# Altium PCB ELF 2 & ELF 2_Lite V1.3.PcbDoc (part 4 of 8)
Units mm, origin at the board's own origin, x right, y up, seen from the top; angles counter-clockwise.
Board outline 120 x 75 mm, 4 copper layers (01 TOP, 02 GND, 03 Signal, 04 BOT), stack 0.603 mm thick; 470 components, 412 nets, 2075 pads, 1565 vias.
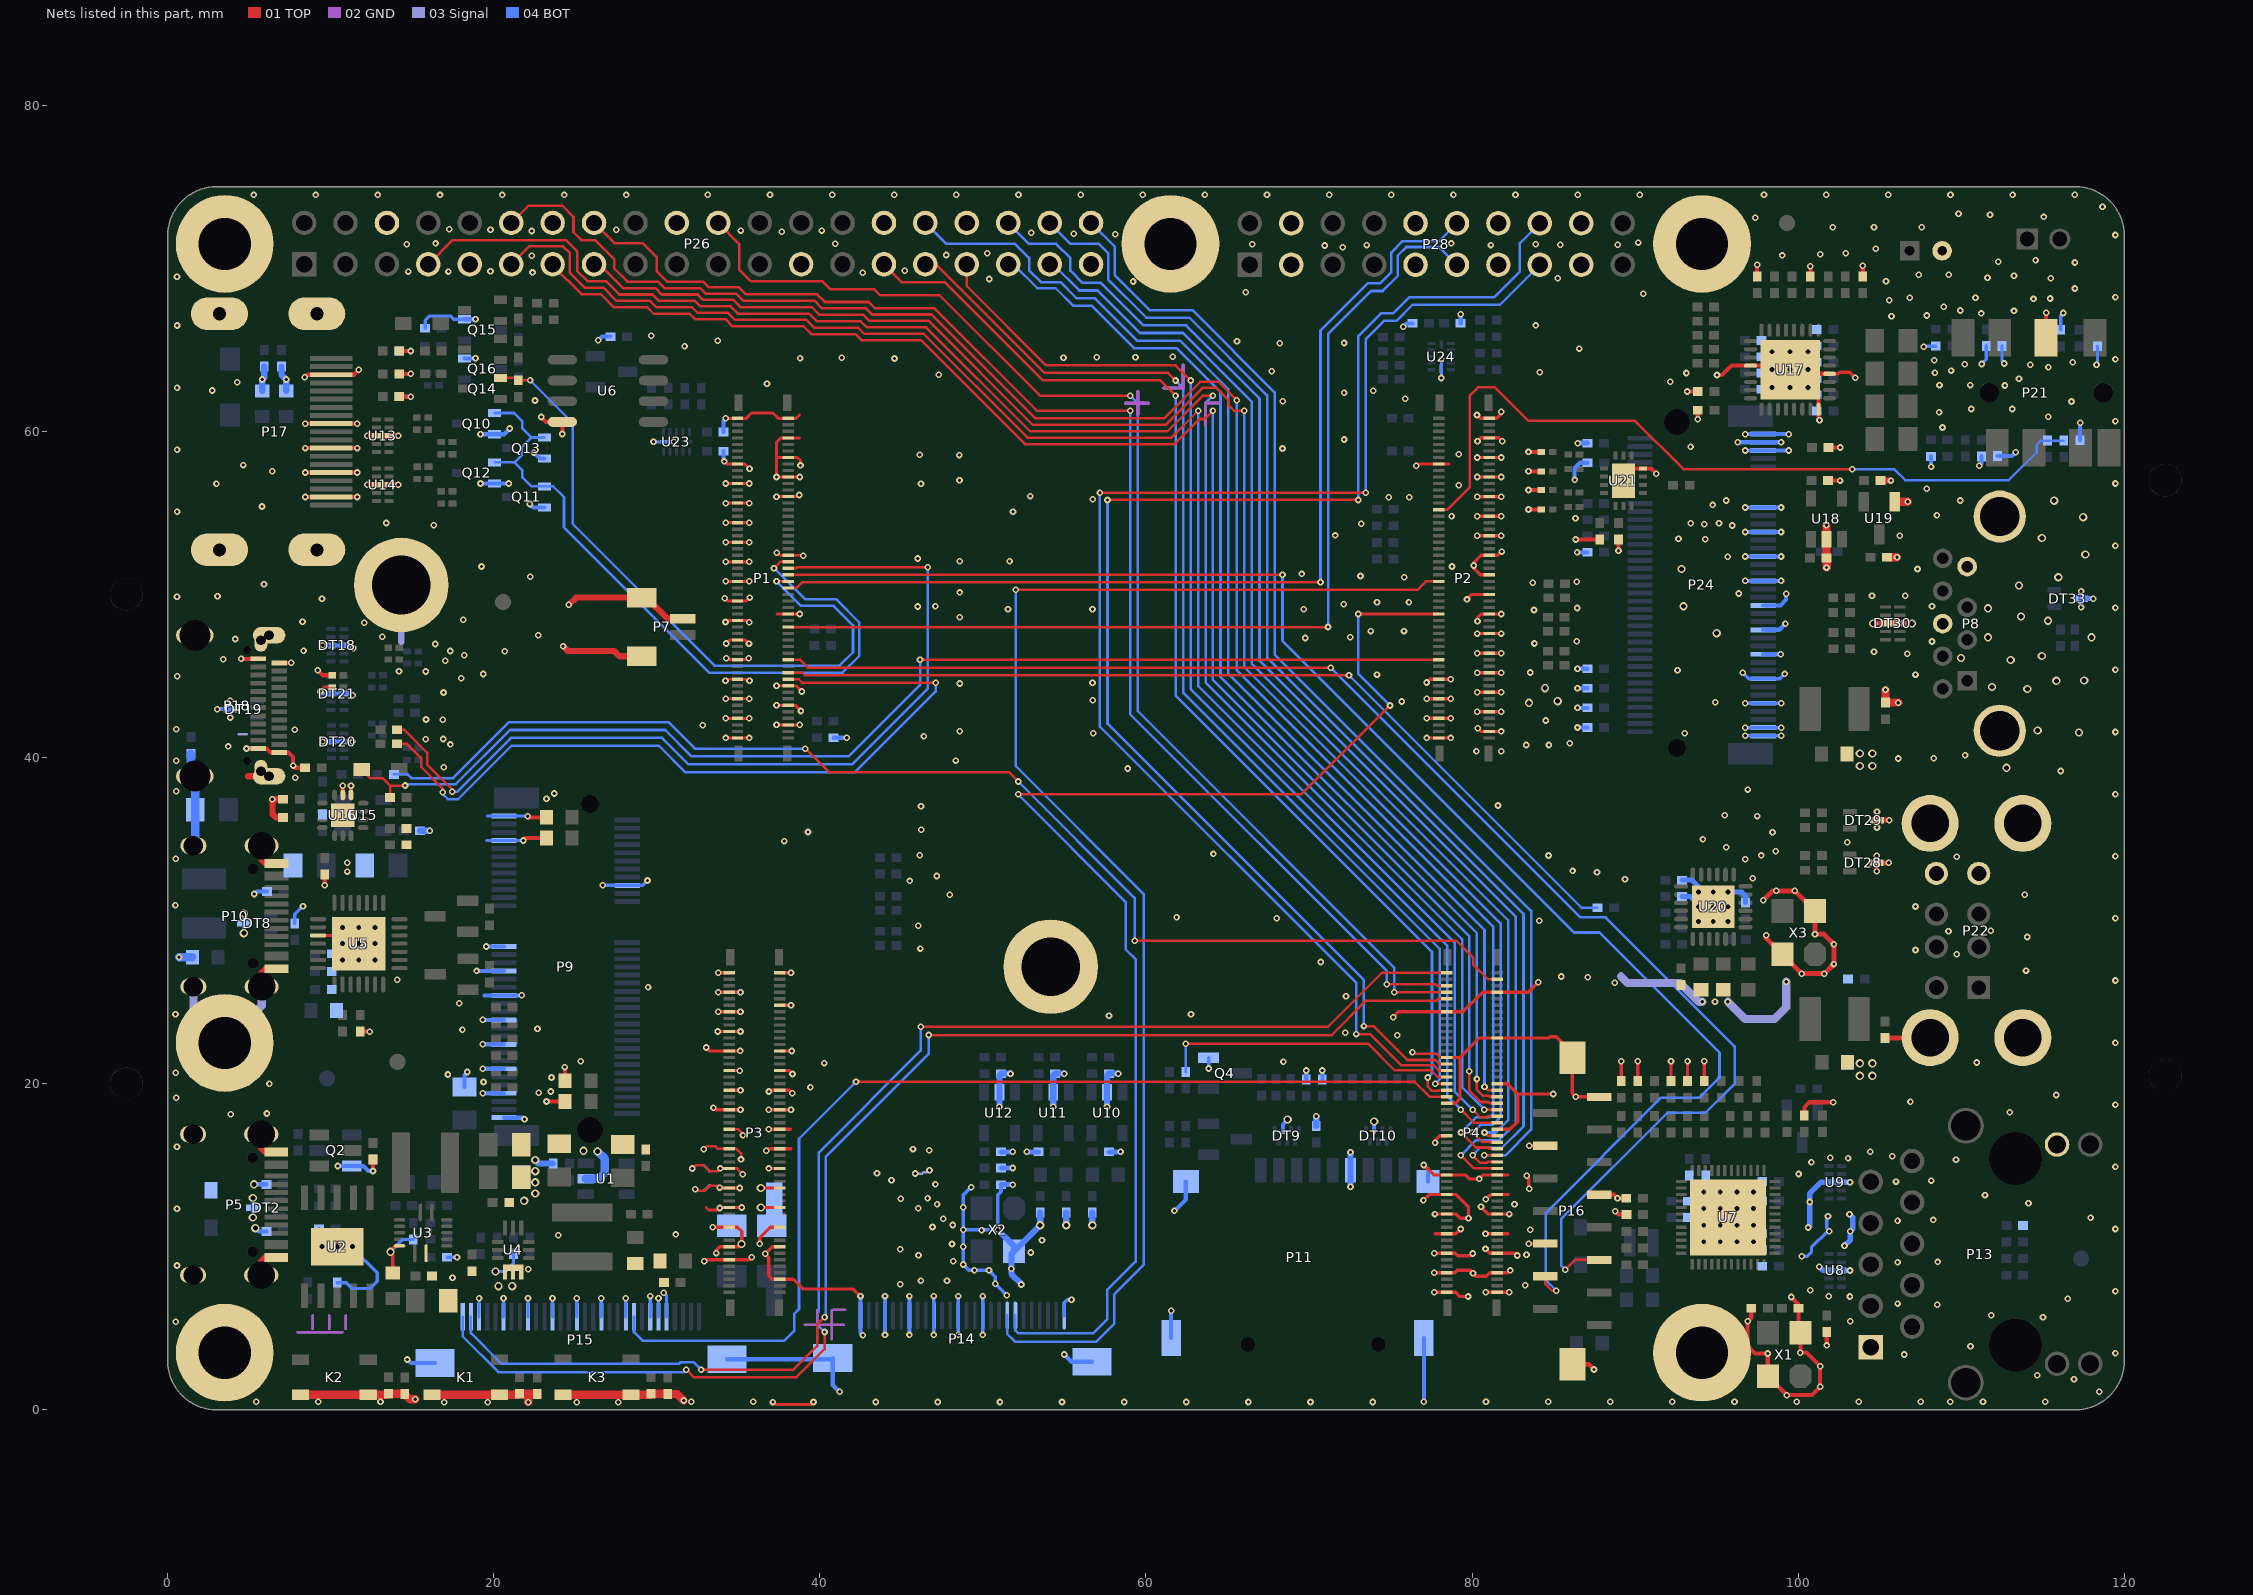
[diagram p5: the nets of this part, all layers, seen from the top]

## Via types
v1: diameter 0.406, hole 0.203, 01 TOP to 04 BOT, tented both sides, 1349 vias
v2: diameter 0.508, hole 0.305, 01 TOP to 04 BOT, tented both sides, 173 vias
v3: diameter 0.6, hole 0.3, 01 TOP to 04 BOT, tented both sides, 34 vias
v4: diameter 0.6, hole 0.3, 01 TOP to 04 BOT, 9 vias

## Nets (pads, with @x,y where several pads share a name; then routed paths per layer and width w, separated by ;. In a path a pad name is that pad's centre, name@x,y a point inside that pad or via, vN(x,y) a via of type N, cw(c..) or ccw(c..) an arc to the next point about the centre after c; other vN are vias at no path point) (continued)
GND: C1.1 C2.1 C3.1 C4.1 C5.1 C6.1 C7.1 C9.1 C10.1 C11.1 C12.1 C13.1 C14.1 C15.1 C17.1 C18.2 C19.1 C20.1 C21.1 C22.1 C23.1 C24.1 C25.1 C26.1 C27.1 C29.1 C30.1 C31.1 C32.1 C33.1 C34.1 C35.2 C36.1 C37.1 C38.1 C39.1 C40.1 C41.1 C42.1 C43.1 C44.1 C45.1 C46.1 C47.1 C48.1 C49.1 C50.1 C51.1 C52.1 C53.1 C54.1 C55.1 C56.1 C57.1 C58.1 C59.1 C60.1 C61.1 C62.1 C74.1 C75.1 C76.1 C77.2 C78.2 C79.1 C80.1 C81.1 C84.2 C85.2 C90.1 C91.1 C92.1 C93.1 C94.1 C95.1 C96.1 C97.1 C98.1 C99.1 C100.1 C101.1 C102.1 C103.1 C105.1 C108.1 C110.1 C112.1 C113.1 C114.1 C115.1 C116.1 C117.1 C118.1 C119.1 C120.1 C121.1 C123.1 C124.1 C125.1 C126.1 C127.1 C128.1 C129.1 C130.1 C131.1 C135.1 C136.1 C137.1 C138.1 C139.1 C141.2 C142.1 C143.1 C150.1 C151.1 C152.1 C153.1 D2.2 DT1.1 DT2.3 DT3.2 DT4.2 DT5.2 DT6.2 DT7.1 DT8.3 DT9.2 DT10.2 DT11.2 DT12.2 DT13.2 DT14.1 DT15.2 DT16.2 DT17.1 DT18.3 DT18.8 DT19.3 DT20.3 DT20.8 DT21.3 DT21.8 DT22.1 DT23.1 DT24.1 DT25.1 DT26.1 DT27.1 DT28.3 DT29.3 DT30.3 DT30.8 DT31.1 DT33.3 DT35.2 K1.3 K1.4 K2.3 K2.4 K3.3 K3.4 M1.0 M2.0 M3.0 M4.0 M16.0 M17.0 P1.1 P1.2 P1.8 P1.14 P1.15 P1.20 P1.21 P1.26 P1.27 P1.33 P1.39 P1.44 P1.45 P1.51 P1.57 P1.62 P1.63 P1.69 P1.75 P1.81 P1.84 P1.87 P1.90 P1.93 P1.96 P1.99 P2.2 P2.8 P2.14 P2.15 P2.20 P2.26 P2.32 P2.38 P2.44 P2.50 P2.56 P2.62 P2.68 P2.74 P2.80 P2.81 P2.86 P2.87 P2.92 P2.93 P2.98 P2.99 P3.1 P3.2 P3.7 P3.12 P3.13 P3.19 P3.25 P3.26 P3.31 P3.32 P3.37 P3.38 P3.43 P3.44 P3.49 P3.50 P3.55 P3.56 P3.61 P3.62 P3.67 P3.68 P3.73 P3.74 P3.79 P3.80 P3.85 P3.86 P3.89 P3.96 P4.8 P4.13 P4.22 P4.27 P4.36 P4.41 P4.50 P4.51 P4.63 P4.64 P4.69 P4.70 P4.75 P4.76 P4.81 P4.82 P4.87 P4.88 P4.93 P4.94 P4.99 P4.100 P5.A1/B12 P5.B1/A12 P5.E1 P5.E2 P5.E3 P5.E4 P7.0 P7.1 P8.0 P8.4 P8.7 P9.1 P9.7 P9.18 P9.33 P9.39 P9.45 P9.51 P9.57 P9.63 P9.69 P9.75 P10.A1/B12 P10.B1/A12 P10.E1 P10.E2 P10.E3 P10.E4 P11.0 P11.6 P12.1 P13.1 P13.13 P14.0 P14.1 P14.4 P14.7 P14.10 P14.13 P14.16 P14.26 P15.0 P15.5 P15.6 P15.7 P15.10 P15.13 P15.16 P15.19 P15.22 P15.25 P15.28 P16.6 P16.9 P16.12 P16.15 P16.16 P16.17 P17.2 P17.5 P17.8 P17.11 P17.17 P17.20 P18.A1 P18.A12 P18.B1 P18.B12 P18.E1 P18.E2 P18.E3 P18.E4 P20.2 P21.2 P22.4 P22.8 P22.9 P22.10 P22.11 P22.12 P24.1 P24.3 P24.9 P24.15 P24.21 P24.27 P24.33 P24.39 P24.45 P24.51 P24.57 P24.71 P24.73 P24.75 P25.1 P26.6 P26.9 P26.14 P26.20 P26.25 P26.30 P26.34 P26.39 P28.3 P28.4 P28.9 P28.10 P28.13 P28.14 P28.17 P28.18 Q2.2 Q4.2 Q10.2 Q11.2 Q12.2 Q13.2 Q15.2 Q16.2 R18.2 R23.2 R24.2 R32.2 R34.1 R35.1 R54.2 R56.2 R65.2 R66.2 R67.2 R72.2 R73.1 R99.2 R104.2 R105.2 R121.1 R126.1 R132.2 R134.2 R135.2 R145.2 R165.2 R166.2 R172.2 R173.2 U1.2 U2.11 U3.2 U3.14 U4.10 U5.3 U5.29 U6.4 U7.49 U8.3 U8.8 U9.3 U9.8 U10.2 U11.2 U12.2 U13.3 U13.8 U14.3 U14.8 U15.2 U16.8 U16.9 U16.15 U17.12 U17.24 U17.28 U17.33 U18.2 U19.1 U20.25 U21.4 U21.15 U23.6 U24.6 X1.2 X1.4 X2.2 X3.2 X3.4 | length 663.3
  01 TOP w0.156: v1(32.177,14.792) 32.38,14.995 32.874,14.995 33.229,14.639 33.726,14.639 v1(33.887,14.8) P3.61@34.45,14.8 34.919,14.8 v1(35.269,14.451) ; v1(32.352,13.514) 32.426,13.441 32.918,13.441 33.227,13.75 33.735,13.75 v1(33.86,13.625) ; v1(32.888,15.982) 33.057,16.151 33.611,16.151 33.762,16 P3.55@34.45,16 34.884,16 35.167,15.717 35.167,15.354 v1(35.165,15.352) ; 33.019,12.407 33.174,12.252 33.737,12.252 v1(33.86,12.375) ; v1@33.86,13.6 P3.67@34.45,13.6 v1(35.095,13.6) ; P3.49@34.45,17.2 35.002,17.2 35.281,16.921 v1(35.281,16.829) ; P3.31@34.45,20.8 35.084,20.8 v1(35.085,20.799) ; v1(76.339,21.924) 76.339,21.899 76.398,21.839 77.814,21.839 78.053,21.6 P4.27@78.45,21.6
  01 TOP w0.178: v1(34.129,58.157) 34.286,58 P1.15@34.95,58 35.397,58 v1(35.683,57.714) ; v1(34.168,49.773) 34.34,49.6 P1.57@34.95,49.6 35.485,49.6 v1(35.691,49.806) ; v1(34.211,48.309) 34.301,48.4 P1.63@34.95,48.4 35.565,48.4 v1(35.662,48.303) ; v1(34.215,44.713) 34.219,44.709 34.31,44.8 P1.81@34.95,44.8 35.572,44.8 35.674,44.699 v1(35.688,44.713) ; v1(34.237,41.2) P1.99@34.95,41.2 v1(35.663,41.2) ; v1(34.237,42.4) P1.93@34.95,42.4 v1(35.663,42.4) ; v1(34.237,43.6) P1.87@34.95,43.6 v1(35.663,43.6) ; v1(34.237,50.8) P1.51@34.95,50.8 v1(35.663,50.8) ; v1(34.237,52) P1.45@34.95,52 v1(35.663,52) ; v1(34.237,53.2) P1.39@34.95,53.2 v1(35.663,53.2) ; v1(34.237,54.4) P1.33@34.95,54.4 v1(35.663,54.4) ; v1(34.237,55.6) P1.27@34.95,55.6 v1(35.663,55.6) ; v1(34.237,56.8) P1.21@34.95,56.8 v1(35.663,56.8) ; v1(34.237,60.8) P1.1@34.95,60.8 35.488,60.8 35.809,61.121 37.126,61.121 37.447,60.8 P1.2@38.05,60.8 38.536,60.8 38.749,61.013 ; v1(34.251,46.095) 34.346,46 P1.75@34.95,46 35.546,46 v1(35.64,46.095) ; v1(34.256,46.992) 34.465,47.2 P1.69@34.95,47.2 35.437,47.2 v1(35.651,46.987) ; 37.335,58.4 37.337,58.4 ; v1(37.337,42) P1.96@38.05,42 v1(38.763,42) ; v1(37.337,43.2) P1.90@38.05,43.2 38.489,43.2 v1(38.837,42.852) ; v1(37.337,44.4) P1.84@38.05,44.4 38.532,44.4 v1(38.884,44.048) ; v1(37.337,56) P1.26@38.05,56 38.638,56 v1(38.734,56.097) ; v1(37.359,52.565) 37.524,52.4 P1.44@38.05,52.4 38.951,52.4 38.975,52.376 v1(38.975,52.366) ; 37.37,48.8 P1.62@38.05,48.8 v1(38.763,48.8) ; v1(38.763,57.2) P1.20@38.05,57.2 v1(37.337,57.2) 37.337,58.4 ; 38.763,59.6 P1.8@38.05,59.6 37.603,59.6 37.337,59.335 37.337,58.4 ; v1(38.811,57.912) 38.811,58.204 38.616,58.4 P1.14@38.05,58.4 37.337,58.4
  01 TOP w0.198: v2(13.67,9.687) 13.67,9.767 13.953,10.05 U3.14@14.225,10.05
  01 TOP w0.203: U5.3@9.222,29.083 10.222,29.083 v3(10.723,28.583) ; v2(13.67,9.687) 13.8,9.557 C10.1@13.8,8.387 ; v1(32.917,9.1) 33.017,9.2 P3.89@34.45,9.2 35.682,9.2 v1(35.83,9.348) ; v1(33.037,22.212) 33.249,22 P3.25@34.45,22 35.105,22 v1(35.11,22.005) ; v1(33.422,11.2) P3.79@34.45,11.2 34.937,11.2 35.2,10.936 v2(35.2,10.172) 35.029,10 P3.85@34.45,10 33.871,10 33.649,9.779 v1(33.649,9.608) ; v1(33.472,18.513) 33.585,18.4 P3.43@34.45,18.4 v1(35.129,18.4) ; v1(33.74,23.2) P3.19@34.45,23.2 v1(35.129,23.2) ; v1(33.771,24.4) P3.13@34.45,24.4 v1(35.129,24.4) ; v1(33.771,25.6) P3.7@34.45,25.6 v1(35.129,25.6) ; v1(33.771,26.8) P3.1@34.45,26.8 ; v1(33.86,12.375) 33.885,12.4 P3.73@34.45,12.4 v1(35.218,12.4) ; P3.37@34.45,19.6 v1(35.129,19.6) ; v1(36.308,10.176) 36.308,10.544 36.964,11.2 P3.80@37.55,11.2 ; v2(36.381,12.4) P3.74@37.55,12.4 ; v2(36.381,13.6) P3.68@37.55,13.6 ; v1(36.703,15.875) 36.828,16 P3.56@37.55,16 38.211,16 ; v1(36.871,14.8) P3.62@37.55,14.8 ; v1(36.871,17.2) P3.50@37.55,17.2 38.201,17.2 ; v1(36.871,18.4) P3.44@37.55,18.4 v1(38.229,18.4) ; v1(36.876,19.516) 36.96,19.6 P3.38@37.55,19.6 38.12,19.6 v1(38.306,19.413) ; v1(37.121,0.471) 37.274,0.318 39.45,0.318 v1(39.611,0.479) ; P3.86@37.55,10 37.082,10 v1(36.642,9.559) 36.865,9.336 36.865,8.222 37.087,8 P3.96@37.55,8 38.383,8 38.979,7.404 42.058,7.404 v1(42.491,6.971) ; P3.32@37.55,20.8 38.114,20.8 v1(38.325,20.589) ; P3.26@37.55,22 v1(38.278,22) ; P3.12@37.55,24.8 v1(38.229,24.8) ; P3.2@37.55,26.8 v1(38.229,26.8) ; v1(75.159,24.079) 75.479,24.4 P4.13@78.45,24.4 79.438,24.4 80.638,25.6 P4.8@81.55,25.6 83.436,25.6 v1(84.049,26.213) ; v1(76.581,57.887) 76.694,58 P2.15@77.95,58 78.562,58 ; v1(77.013,12.852) 77.36,13.2 P4.69@78.45,13.2 79.017,13.2 79.776,12.441 v1(79.776,11.744) 79.281,11.744 79.024,12 P4.75@78.45,12 v1(77.719,12) ; v1(77.03,15.014) 77.643,14.4 P4.63@78.45,14.4 79.584,14.4 79.827,14.157 v1(80.437,14.157) 80.68,14.4 P4.64@81.55,14.4 82.204,14.4 ; v1(77.206,44.601) 77.405,44.8 P2.81@77.95,44.8 v1(78.681,44.8) ; v1(77.219,41.2) P2.99@77.95,41.2 v1(78.681,41.2) ; v1(77.219,42.4) P2.93@77.95,42.4 v1(78.681,42.4) ; v1(77.219,43.6) P2.87@77.95,43.6 v1(78.681,43.6) ; v1(77.683,7.2) P4.99@78.45,7.2 78.986,7.2 79.243,6.943 v1(79.751,6.943) ; v1(77.683,8.4) P4.93@78.45,8.4 78.936,8.4 79.085,8.548 79.873,8.548 v1(80.056,8.365) 80.233,8.188 80.879,8.188 81.091,8.4 P4.94@81.55,8.4 82.19,8.4 v1(82.335,8.545) ; v1(77.683,9.6) P4.87@78.45,9.6 78.973,9.6 79.122,9.452 79.897,9.452 v1(80.03,9.585) ; v1(77.728,16.375) 77.728,16.525 78.003,16.8 P4.51@78.45,16.8 ; 77.748,10.8 P4.81@78.45,10.8 79.01,10.8 v1(79.294,11.083) ; P4.41@78.45,18.8 78.984,18.8 79.252,19.068 79.252,21.6 ; P4.27@78.45,21.6 79.252,21.6 ; v1(79.682,49.694) 79.988,50 P2.56@81.05,50 ; v1(80.302,61.003) 80.505,60.8 P2.2@81.05,60.8 81.498,60.8 81.783,61.085 v1(81.783,61.213) ; v1(80.319,42.8) P2.92@81.05,42.8 v1(81.781,42.8) ; v1(80.319,44) P2.86@81.05,44 v1(81.781,44) ; v1(80.319,45.2) P2.80@81.05,45.2 v1(81.781,45.2) ; v1(80.319,46.4) P2.74@81.05,46.4 v1(81.781,46.4) ; v1(80.319,47.6) P2.68@81.05,47.6 v1(81.781,47.6) ; v1(80.319,53.6) P2.38@81.05,53.6 v1(81.781,53.6) ; v1(80.319,54.8) P2.32@81.05,54.8 v1(81.781,54.8) ; v1(80.319,56) P2.26@81.05,56 v1(81.781,56) ; v1(80.319,57.2) P2.20@81.05,57.2 v1(81.781,57.2) ; v1(80.319,58.4) P2.14@81.05,58.4 v1(81.781,58.4) ; v1(80.326,48.35) 80.326,48.559 80.567,48.8 P2.62@81.05,48.8 v1(81.781,48.8) ; v1(80.327,59.39) 80.536,59.6 P2.8@81.05,59.6 81.645,59.6 v1(81.843,59.402) ; v1(80.337,41.793) 80.53,41.6 P2.98@81.05,41.6 v1(81.781,41.6) ; v1(80.542,12.444) 80.986,12 P4.76@81.55,12 v1(82.281,12) ; v1(80.818,9.864) 81.082,9.6 P4.88@81.55,9.6 82.631,9.6 v1(82.773,9.458) ; v1(80.819,10.8) P4.82@81.55,10.8 82.196,10.8 ; v1(80.843,7.197) 80.846,7.2 P4.100@81.55,7.2 v1(82.281,7.2) ; v1(80.844,12.904) 80.881,12.904 80.946,12.968 80.946,13.005 81.095,13.154 81.132,13.154 81.178,13.2 P4.70@81.55,13.2 82.206,13.2 ; P2.50@81.05,51.2 80.511,51.2 80.09,51.62 v1(80.09,51.772) 80.09,51.946 80.544,52.4 P2.44@81.05,52.4 81.585,52.4 v1(81.813,52.629) ; P4.50@81.55,17.2 82.319,17.2 82.789,17.67 82.789,19.364 ; P4.36@81.55,20 82.153,20 82.789,19.364 ; v1(83.357,14.357) 83.357,14.335 83.478,14.214 83.478,13.579 v1(83.51,13.547) ; v1(83.465,10.189) P16.6@84.497,10.189 ; v1(83.51,16.189) P16.12@84.497,16.189 ; v1(84.983,19.364) 82.789,19.364 ; P16.15@87.797,19.189 v1(86.352,19.189) 86.147,19.394 P16.16@86.147,21.589 86.147,21.888 85.167,22.868 84.777,22.868 84.71,22.8 P4.22@81.55,22.8 80.452,22.8 79.252,21.6 ; R54.2@89.149,20.151 v1(89.149,21.37) ; R56.2@90.165,20.151 v1(90.165,21.37) ; R65.2@92.197,20.151 v1(92.197,21.37) ; R66.2@93.213,20.151 v1(93.213,21.37) ; R67.2@94.229,20.151 v1(94.229,21.37)
  01 TOP w0.229: v1(89.281,56.972) 89.281,57.161 89.842,57.722 U21.4@90.481,57.722 90.969,57.722 v1(91.288,57.404) ; U17.28@101.922,63.532 102.457,63.532 102.543,63.619 103.161,63.619 v1(103.5,63.28)
  01 TOP w0.254: v1(4.506,46.055) 4.641,46.055 4.651,46.045 5.089,46.045 5.099,46.055 P18.B12@5.545,46.055 ; v1(4.839,40.555) P18.B1@5.545,40.555 6.058,40.555 6.308,40.305 P18.A12@6.845,40.305 7.417,40.305 7.697,40.024 v1(7.697,39.504) 7.832,39.369 C84.2@8.438,39.369 ; P18.A1@6.848,45.805 v1(7.583,45.805) ; v1(8.404,63.318) 8.56,63.475 P17.17@10.038,63.475 11.43,63.475 v1(11.731,63.776) ; v1(8.447,55.975) P17.2@10.038,55.975 v1(11.628,55.975) ; v1(8.447,57.475) P17.5@10.038,57.475 v1(11.628,57.475) ; v1(8.447,58.975) P17.8@10.038,58.975 v1(11.628,58.975) ; v1(8.447,60.475) P17.11@10.038,60.475 v1(11.628,60.475) ; v1(9.213,45.347) 9.511,45.048 R105.2@10.092,45.048 ; v1(9.375,44.047) 9.626,44.298 R104.2@10.092,44.298 ; v1(9.64,32.158) C85.2@9.64,32.832 ; U16.9@10.744,37.7 v1(10.744,38.272) ; U16.8@11.244,37.7 v1(11.244,38.264) ; C31.1@11.808,23.187 v1(12.403,23.187) ; v1(12.593,14.639) R23.2@12.593,15.35 ; DT16.2@14.209,62.126 v1(14.905,62.126) ; DT13.2@14.209,63.526 v1(14.905,63.526) ; DT15.2@14.209,64.926 v1(14.905,64.926) ; v1(21.804,34.911) 21.953,35.061 C4.1@23.236,35.061 ; v1(22.091,36.396) 22.156,36.331 C25.1@23.236,36.331 ; v1(22.911,60.884) 23.216,60.579 U6.4@24.206,60.579 v1(24.206,59.842) ; v1(23.236,18.906) C21.1@24.379,18.906 ; v1(24.353,21.015) 24.379,20.989 C110.1@24.379,20.176 ; v1(83.453,55.211) R165.2@84.249,55.211 ; v1(83.453,56.405) R166.2@84.249,56.405 ; v1(83.453,57.545) R173.2@84.249,57.545 ; v1(83.453,58.739) R172.2@84.249,58.739 ; P16.17@86.147,2.789 87.156,2.789 v1(87.472,2.473) ; v1(86.36,53.365) C142.1@87.833,53.365 ; P16.9@87.797,13.189 88.694,13.189 v1(88.912,12.971) C36.1@89.452,12.971 ; v1(88.768,12.175) 88.971,11.972 C37.1@89.454,11.972 ; v1(88.976,52.68) C143.1@88.976,53.365 ; v1(93.187,62.442) C103.1@93.835,62.442 ; v1(93.835,60.753) C102.1@93.835,61.299 ; v1(95.016,63.458) 95.321,63.458 95.895,64.032 U17.12@97.072,64.032 98.147,64.032 v3(98.397,63.782) ; C48.1@97.118,6.225 97.118,5.641 v1(96.896,5.419) 96.896,3.895 97.337,3.454 v1(98.131,3.454) X1.4@98.131,2.062 v1(99.295,0.898) 100.833,0.898 v1(101.341,1.406) v1(101.341,2.676) 100.512,3.505 v1(100.131,3.505) X1.2@100.131,4.712 100.014,4.83 C49.1@100.014,6.225 100.014,6.467 v1(99.563,6.918) ; C108.1@97.479,69.529 v1(97.479,70.226) ; C47.1@100.373,18.052 100.373,18.573 100.655,18.856 v1(102.154,18.856) ; v3(100.597,62.682) 101.242,62.037 101.242,61.865 101.247,61.86 U17.24@101.247,61.357 101.247,60.744 v1(101.302,60.689) ; v3(100.597,63.782) 100.847,63.532 U17.28@101.922,63.532 ; C105.1@100.744,69.501 v1(100.744,70.127) ; C115.1@101.728,52.24 C115.1@101.736,52.232 ; C116.1@101.836,56.982 v1(102.564,56.982) ; R121.1@101.849,59.013 v1(102.577,59.013) ; C114.1@103.956,69.501 v1(103.956,70.163) ; P21.2@115.202,65.756 v1(115.202,67.273)
  01 TOP w0.305: v1(97.844,31.243) 98.428,31.827 v1(98.657,31.827) v1(99.783,31.827) X3.2@101.023,30.587 v1(101.023,29.164) 101.573,29.164 v1(102.187,28.551) v1(102.187,27.331) v1(101.603,26.747) v1(100.212,26.747) X3.4@99.023,27.937 98.034,28.925 v1(98.034,29.1) ; v1(101.747,3.946) R73.1@101.747,4.759 ; v1(104.807,33.017) DT28.3@104.807,33.537 ; v1(104.807,33.982) DT28.3@104.807,33.537 ; v1(104.833,35.708) DT29.3@104.833,36.153 ; v1(104.833,36.673) DT29.3@104.833,36.153 ; DT27.1@105.329,22.793 108.064,22.793 P22.11@108.09,22.818 ; v1(105.557,33.537) DT28.3@104.807,33.537 ; v1(105.583,36.153) DT29.3@104.833,36.153
  01 TOP w0.356: v1(12.25,56.726) U14.8@12.816,56.726 U14.3@13.586,56.726 v1(14.153,56.726) ; v1(12.25,59.726) U13.8@12.816,59.726 U13.3@13.586,59.726 v1(14.153,59.726)
  01 TOP w0.381: 4.938,38.855 P18.E2@6.22,38.855 ; P5.E2@5.743,8.255 5.743,9.109 5.983,9.35 P5.B1/A12@6.658,9.35 ; P5.E1@5.743,16.895 5.743,16.041 5.983,15.8 P5.A1/B12@6.658,15.8 ; P10.E2@5.765,25.95 5.765,26.804 6.006,27.045 P10.B1/A12@6.68,27.045 ; P10.E1@5.765,34.59 5.765,33.736 6.006,33.495 P10.A1/B12@6.68,33.495 ; C90.1@7.089,36.317 6.649,36.317 6.425,36.542 v1(6.425,37.435) C91.1@7.089,37.435 ; v1(24.252,46.821) 24.542,46.53 27.384,46.53 27.708,46.206 P7.0@29.068,46.206 ; v1(24.607,49.361) 25.052,49.806 P7.0@29.068,49.806 29.369,49.806 30.669,48.506 P7.1@31.593,48.506 ; v2(104.59,48.224) DT30.8@105.384,48.224 DT30.3@106.184,48.224 v2(106.978,48.224) ; C118.1@105.036,56.982 v1(105.682,56.982)
  01 TOP w0.508: K2.3@8.158,0.915 K2.4@12.308,0.915 13.466,0.915 DT5.2@13.533,0.982 14.522,0.982 C17.1@14.54,0.964 14.86,0.644 v1(15.184,0.644) ; K1.3@16.208,0.915 K1.4@20.358,0.915 21.516,0.915 DT4.2@21.583,0.982 22.116,0.982 ; v1(22.116,0.47) 22.116,0.982 ; C12.1@22.668,0.964 22.65,0.982 22.116,0.982 ; K3.3@24.258,0.915 K3.4@28.408,0.915 29.566,0.915 DT6.2@29.633,0.982 30.651,0.982 C20.1@30.669,0.964 31.247,0.964 v1(31.643,0.568) ; U18.2@101.728,53.382 v1(101.728,54.246) ; C115.1@101.736,52.232 U18.2@101.736,53.374 ; v1@101.744,51.656 C115.1@101.744,52.224 ; v1(105.354,44.146) DT31.1@105.354,43.367 v1(106.133,43.367) ; C117.1@105.436,52.282 v1(106.054,52.282) ; U19.1@105.906,55.677 v1(106.713,55.677)
  02 GND w0.156: 7.969,4.76 10.717,4.76 ; 8.904,4.978 8.904,5.767 ; 9.92,4.978 9.92,5.767 ; 10.936,4.978 10.936,5.767 ; 39.074,5.224 39.836,5.222 ; 39.836,4.319 39.836,5.222 ; 39.836,6.097 39.836,5.222 ; 40.74,4.319 40.74,5.22 ; 40.74,6.097 40.74,5.22 ; 40.821,6.131 41.554,6.129 ; 41.474,5.218 40.74,5.22 ; 39.836,5.222 40.74,5.22
  02 GND w0.178: 63.656,60.391 63.656,61.73 64.479,61.73
  02 GND w0.203: 58.758,61.732 59.496,61.732 ; 59.496,61.04 59.496,61.732 ; 59.496,62.442 59.496,61.732 ; 60.159,61.732 59.496,61.732 ; 61.094,62.658 62.278,62.658 62.278,64.061
  03 Signal w0.156: 4.35,41.421 4.849,41.422 ; 7.97,4.758 10.717,4.756 ; 8.904,4.978 8.904,5.767 ; 9.92,4.978 9.92,5.767 ; 10.936,4.978 10.936,5.767 ; 32.874,14.995 33.229,14.639 ; 32.895,13.418 33.25,13.773 ; v1(45.842,14.487) 46.279,14.486 46.352,14.559 46.593,14.559 v1(46.723,14.689)
  03 Signal w0.178: 63.656,60.391 63.656,61.73 64.479,61.73
  03 Signal w0.203: 58.758,61.732 59.496,61.732 ; 59.496,61.04 59.496,61.732 ; 59.496,62.442 59.496,61.732 ; 60.159,61.732 59.496,61.732 ; 61.094,62.658 62.278,62.658 62.278,64.061
  03 Signal w0.381: 14.325,47.074 P25.1@14.325,50.58
  03 Signal w0.508: P10.E4@1.585,25.95 1.585,24.415 M17.0@3.5,22.5 5.765,24.765 P10.E2@5.765,25.95 ; 89.123,26.577 89.53,26.171 92.756,26.171 93.906,25.02 v1(94.11,25.02) ; v1(95.685,25.02) 96.744,23.961 98.547,23.961 99.258,24.672 v1(99.258,26.247)
  04 BOT w0.178: v1(29.794,59.36) U23.6@30.453,59.36 v1(31.04,59.36) ; v1(78.111,63.275) U24.6@78.111,63.836 v1(78.111,64.423)
  04 BOT w0.198: v2(13.67,9.687) 14.431,10.448 R24.2@15.057,10.448 ; C19.1@17.14,9.356 v1(17.749,9.356)
  04 BOT w0.203: R35.1@7.8,29.828 7.8,30.38 v1(8.3,30.88) ; C7.1@10.4,7.798 10.951,7.798 11.316,7.433 12.4,7.433 12.847,7.88 12.847,8.391 11.331,9.907 v2(11.331,10) ; R99.2@15.793,66.326 15.793,66.805 16.066,67.078 17.344,67.078 17.546,66.876 Q15.2@18.201,66.876 ; P15.28@19.1,5.7 v1(19.1,6.834) ; 19.572,34.911 P9.7@20.629,34.911 v1(21.804,34.911) ; 19.596,36.411 P9.1@20.629,36.411 22.076,36.411 v1(22.091,36.396) ; v2(20.114,8.474) 20.709,8.474 21.212,8.977 R32.2@21.212,9.547 ; P15.25@20.6,5.7 v1(20.6,6.834) ; P15.22@22.1,5.7 v1(22.1,6.834) ; P15.19@23.6,5.7 v1(23.6,6.834) ; P15.16@25.1,5.7 v1(25.1,6.834) ; P15.13@26.6,5.7 v1(26.6,6.834) ; v1(26.69,32.161) P9.18@28.179,32.161 29.135,32.161 v1(29.429,32.455) ; P15.10@28.1,5.7 v1(28.1,6.834) ; v1(29.595,6.972) 29.6,6.967 P15.7@29.6,5.7 ; P15.6@30.1,5.7 v1(30.1,6.835) ; v1(30.428,7.17) 30.6,6.998 P15.5@30.6,5.7 ; v1(63.841,20.929) Q4.2@63.841,21.584 ; v1(96.601,45.2) 96.971,44.83 P24.15@97.85,44.83 98.87,44.83 v1(99.166,45.126) ; v1(96.746,41.33) P24.1@97.85,41.33 v1(98.954,41.33) ; v1(96.746,41.83) P24.3@97.85,41.83 v1(98.954,41.83) ; v1(96.746,43.33) P24.9@97.85,43.33 v1(98.954,43.33) ; v1(100.223,9.407) 100.553,9.407 100.807,9.661 100.807,9.956 101.808,10.956 v1(101.9,10.956) 101.74,11.116 101.74,11.787 v1(101.825,11.872) ; v1(107.702,65.191) 107.74,65.23 C120.1@108.432,65.23 ; v1(111.252,64.135) 111.53,64.413 R134.2@111.53,65.242 ; DT23.1@112.496,65.242 112.496,64.288 v1(112.624,64.16) ; R126.1@116.102,66.233 116.102,67.106 v1(116.256,67.259) ; v1(118.288,64.084) 118.35,64.147 DT25.1@118.35,65.217
  04 BOT w0.229: v1(42.491,6.971) P14.1@42.491,5.78 42.491,4.721 v1(42.639,4.573) ; v1(43.991,4.589) P14.4@43.991,5.78 v1(43.991,6.971) ; v1(45.491,4.589) P14.7@45.491,5.78 v1(45.491,6.971) ; v1(46.991,4.589) P14.10@46.991,5.78 v1(46.991,6.971) ; v1(48.491,4.589) P14.13@48.491,5.78 v1(48.491,6.971) ; v1(49.281,13.654) 48.798,13.171 v1(48.798,12.411) v1(48.798,11.038) ; v1(49.991,4.589) P14.16@49.991,5.78 v1(49.991,6.971) ; C50.1@51.11,13.806 51.11,13.375 50.907,13.171 v1(50.907,11.038) 49.941,11.038 v1(49.916,11.012) 49.891,11.038 v1(48.798,11.038) ; v1(51.465,7.025) v1(50.759,7.732) 50.759,8.163 v1(50.373,8.549) v1(49.478,8.549) 49.154,8.549 v1(48.798,8.904) v1(48.798,9.994) v1(48.798,11.038) ; P14.26@54.991,5.78 54.991,6.563 55.174,6.745 v1(55.428,6.745)
  04 BOT w0.254: v1(3.035,42.968) DT19.3@3.841,42.968 ; v1(3.841,42.453) DT19.3@3.841,42.968 ; v1(3.841,43.483) DT19.3@3.841,42.968 ; v2(4.675,29.223) DT8.3@4.675,29.824 v2(4.675,30.424) ; v2(5.228,11.786) DT2.3@5.228,12.387 v2(5.228,12.987) ; v2(5.303,13.826) DT3.2@6.065,13.826 ; v1(5.31,31.627) 5.469,31.787 R34.1@6.088,31.787 ; v2(5.38,11.134) 5.585,10.929 DT35.2@6.065,10.929 ; R18.2@9.291,11.083 9.291,10.178 v2(9.469,10) ; v1(9.375,44.047) 9.498,43.925 DT21.3@10.033,43.925 DT21.8@10.803,43.925 11.248,43.925 v1(11.346,43.826) ; v1(9.513,46.875) DT18.3@10.033,46.875 DT18.8@10.803,46.875 11.232,46.875 v1(11.39,46.717) ; v1(9.528,40.975) DT20.3@10.048,40.975 DT20.8@10.818,40.975 v1(11.338,40.975) ; v1(10.44,14.95) Q2.2@11.3,14.95 11.996,14.95 12.307,14.639 v1(12.593,14.639) ; DT11.2@14.209,62.126 v1(14.905,62.126) ; DT12.2@14.209,64.926 v1(14.905,64.926) ; v1(14.701,3.082) 14.921,2.863 P15.0@16.4,2.863 ; Q16.2@18.201,64.476 v1(18.883,64.476) ; Q15.2@18.201,66.876 v1(18.883,66.876) ; C3.1@18.207,19.795 18.207,20.532 v1(18.384,20.71) ; v1(18.947,26.911) P9.39@20.629,26.911 ; v1(19.189,56.801) Q12.2@20.051,56.801 v1(20.913,56.801) ; v1(19.189,59.826) Q10.2@20.051,59.826 20.633,59.826 v1(20.98,60.173) ; v1(19.323,19.411) P9.69@20.629,19.411 ; v1(19.323,20.911) P9.63@20.629,20.911 ; v1(19.323,22.411) P9.57@20.629,22.411 ; v1(19.323,23.911) P9.51@20.629,23.911 ; 19.442,25.411 P9.45@20.629,25.411 v1(21.711,25.411) ; v1(19.547,28.411) P9.33@20.629,28.411 ; P9.75@20.629,17.911 21.792,17.911 21.89,17.814 v1(21.89,17.817) ; v1(22.2,55.55) 22.424,55.326 Q11.2@23.101,55.326 ; v1(22.454,58.699) 22.827,58.326 Q13.2@23.101,58.326 ; v1(26.411,65.591) 26.631,65.811 C35.2@27.153,65.811 ; C150.1@34.087,58.788 34.087,58.2 v1(34.129,58.157) ; C151.1@34.087,59.956 34.087,60.65 v1(34.237,60.8) ; P15.0@34.3,3.1 40.711,3.1 P14.0@40.791,3.18 40.791,1.529 v1(41.219,1.101) ; R135.2@40.838,41.208 v1(41.651,41.208) ; v1(54.986,3.387) 55.429,2.943 P14.0@56.691,2.943 ; P11.0@61.541,4.401 v1(61.541,6.077) ; v1(61.742,12.201) 62.441,12.9 P11.0@62.441,14.001 ; DT9.2@68.391,17.15 68.391,17.5 v2(68.691,17.799) ; C30.1@69.825,20.244 v1(69.825,20.807) ; C29.1@70.815,20.244 v1(70.815,20.807) ; DT10.2@73.991,17.15 v2(73.991,17.681) ; v1(75.782,66.419) 75.987,66.624 C153.1@76.352,66.624 ; v1(77.03,15.014) 77.291,14.752 P11.0@77.291,14.001 ; v1(77.041,0.483) P11.0@77.041,4.401 ; C152.1@79.299,66.624 v1(79.299,67.185) ; v1(86.284,57.023) 86.284,57.739 86.625,58.08 C131.1@87.084,58.08 ; v1(86.436,52.58) C135.1@87.084,52.58 ; v1(86.463,41.843) C139.1@87.084,41.843 ; v1(86.463,43.043) C137.1@87.084,43.043 ; v1(86.463,44.243) C138.1@87.084,44.243 ; v1(86.463,45.443) C136.1@87.084,45.443 ; v1(96.285,59.33) P24.73@97.85,59.33 v1(98.946,59.33) ; v1(96.754,50.83) P24.39@97.85,50.83 v1(98.946,50.83) ; v1(96.754,52.33) P24.45@97.85,52.33 v1(98.946,52.33) ; v1(96.754,53.83) P24.51@97.85,53.83 v1(98.946,53.83) ; v1(96.754,55.33) P24.57@97.85,55.33 v1(98.946,55.33) ; v1(96.754,58.83) P24.71@97.85,58.83 v1(99.415,58.83) ; v1(96.754,59.83) P24.75@97.85,59.83 v1(99.415,59.83) ; P24.21@97.828,46.33 P24.21@97.85,46.33 v1(98.924,46.33) ; P24.27@97.85,47.83 98.833,47.83 v1(99.212,48.209) ; P24.33@97.85,49.33 98.911,49.33 99.258,49.678 v1(99.258,50.035) ; v1(108.145,57.822) C119.1@108.145,58.46 ; v1(111.104,57.888) 111.232,58.016 R132.2@111.232,58.471 ; DT22.1@112.232,58.496 113.105,58.496 v1(113.33,58.721) ; DT24.1@117.288,59.462 v1(117.288,60.528)
  04 BOT w0.305: C50.1@51.11,13.806 v1(51.826,13.806) ; C56.1@51.11,14.822 v1(51.826,14.822) ; C62.1@51.117,15.813 v1(51.834,15.813) ; v1(52.685,15.813) C57.1@53.401,15.813 ; C54.1@57.725,15.813 v1(58.442,15.813) ; v1(86.482,59.28) C130.1@87.084,59.28 ; C128.1@92.864,31.476 93.367,31.476 93.888,30.956 v4(93.888,30.844) ; R145.2@92.864,32.476 93.481,32.476 93.888,32.07 v4(93.888,31.744) ; v4(95.688,31.744) 96.544,31.744 96.763,31.526 C126.1@96.763,31.102 ; P22.11@108.064,22.793 P22.11@108.09,22.818 ; v1(117.345,49.221) DT33.3@117.345,49.741 ; v1(117.345,50.186) DT33.3@117.345,49.741 ; v1(118.094,49.741) DT33.3@117.345,49.741
  04 BOT w0.33: v1(100.608,11.179) 100.609,11.177 100.703,11.271 v1(100.703,12.745) 100.703,13.265 101.392,13.953 U9.3@101.896,13.953 U9.8@102.666,13.953 v1(103.17,13.953) ; v1(101.28,8.778) 101.515,8.543 U8.3@101.896,8.543 U8.8@102.666,8.543 v1(103.17,8.543) ; v1(102.839,10.067) 103.195,10.423 v1(103.195,10.956) 103.337,11.098 103.337,11.805 v1(103.144,11.998)
  04 BOT w0.381: C75.1@5.801,62.488 v1(5.801,63.182) 5.926,63.307 C76.1@5.926,63.968 ; DT14.1@6.976,63.976 6.976,63.482 v1(7.276,63.182) C74.1@7.276,62.488 ; C77.2@15.473,35.508 v1(16.083,35.508) ; v2(22.545,15.317) 22.766,15.096 C5.1@23.642,15.096 ; v1(50.907,11.038) 51.907,10.038 X2.2@51.907,9.713 ; v1(51.009,18.584) U12.2@51.009,19.463 51.009,20.505 C61.1@51.117,20.613 v1(51.694,20.613) ; v1(52.342,7.685) 52.38,7.685 51.745,8.32 v1(51.745,8.65) 51.745,9.551 X2.2@51.907,9.713 ; C60.1@53.509,12.097 v2(53.509,11.315) X2.2@51.907,9.713 ; v1(54.309,18.584) U11.2@54.309,19.463 54.309,20.505 C55.1@54.417,20.613 v1(54.994,20.613) ; v2(55.109,11.315) C58.1@55.109,12.097 ; v2(56.709,11.315) C59.1@56.709,12.097 ; v1(57.609,18.584) U10.2@57.609,19.463 57.609,20.505 C53.1@57.717,20.613 v1(58.294,20.613) ; DT7.1@70.441,17.408 v1(70.441,18.004) ; v1(72.541,13.67) P11.6@72.541,14.701 v1(72.541,15.786)
  04 BOT w0.508: v1(0.703,27.748) C26.1@1.516,27.748 ; DT17.1@1.427,40.233 1.427,39.098 P18.E4@1.67,38.855 1.697,38.828 C80.1@1.697,36.788 1.697,34.702 P10.E3@1.585,34.59 ; U1.2@25.641,14.162 26.419,14.162 26.808,14.551 26.808,15.394 v2(26.362,15.84)
  other v1: 16.962,0.466 19.629,0.466 25.09,0.466 27.63,0.466 43.421,0.479 47.231,0.479 51.041,0.479 54.851,0.479 58.661,0.479 62.471,0.479 66.281,0.479 70.091,0.479 73.901,0.479 80.851,0.483 84.661,0.483 88.471,0.483 92.281,0.483 96.091,0.483 99.901,0.483 103.711,0.483 107.521,0.483 109.312,0.485 111.331,0.483 115.141,0.483 5.437,0.49 9.247,0.49 13.057,0.49 32.107,0.49 35.917,0.49 118.46,1.101 116.911,1.863 114.65,2.117 106.497,3.387 119.451,3.463 110.561,3.895 0.503,5.394 103.195,5.419 115.006,5.673 111.831,5.8 108.529,6.435 106.091,6.511 116.53,6.816 103.169,6.946 101.874,6.969 119.451,7.273 100.734,7.337 83.256,7.629 44.927,7.705 46.197,7.908 47.798,7.908 17.47,8.086 22.112,8.617 0.579,8.848 106.091,9.051 108.552,9.066 48.179,9.102 46.045,9.483 83.332,9.508 52.939,9.641 44.927,9.839 48.102,10.169 53.624,10.403 23.947,10.702 31.161,10.753 83.561,11.032 119.451,11.083 46.909,11.21 48.14,11.333 106.091,11.591 108.275,11.642 47.558,11.704 117.927,11.769 0.579,12.328 46.037,12.36 47.188,12.607 82.596,12.607 114.117,12.658 44.953,12.937 46.606,12.97 111.45,13.166 47.086,13.826 105.992,13.992 108.148,14.055 44.394,14.08 100.02,14.461 43.505,14.512 119.451,14.893 100.807,15.173 109.672,15.325 103.055,15.427 101.963,15.452 105.755,15.549 104.414,15.82 46.705,15.909 45.715,15.985 0.579,16.138 3.875,18.119 6.091,18.17 112.974,18.246 119.451,18.703 106.878,18.881 0.525,19.139 115.824,19.304 22.753,19.44 23.49,19.516 39.421,19.787 6.243,19.999 19.375,20.1 23.541,20.38 17.191,20.557 0.503,20.659 40.259,21.26 110.942,21.294 68.428,21.336 25.344,21.37 119.451,22.513 75.404,22.966 72.212,23.114 18.08,23.301 22.682,23.368 57.734,24.155 0.486,24.257 62.763,24.257 17.876,24.926 94.897,25.02 72.263,25.349 29.464,25.908 88.748,26.187 119.451,26.323 14.092,26.374 87.097,26.518 85.471,26.568 113.965,26.933 70.714,27.457 109.728,27.94 107.188,28.194 46.166,28.283 114.041,28.99 109.215,29.346 111.806,29.371 46.028,29.675 84.125,29.997 68.021,30.15 119.451,30.133 61.874,30.201 107.188,30.861 0.478,30.933 47.973,31.587 113.888,31.581 45.506,32.432 89.374,32.538 97.216,32.604 47.176,32.735 87.657,32.972 11.018,33.003 86.16,33.044 11.018,33.537 0.508,33.782 96.744,33.762 109.728,33.909 119.451,33.943 84.681,33.987 46.128,34 97.734,33.994 64.135,34.087 98.623,34.248 95.575,34.502 102.997,34.798 37.821,34.874 94.153,34.985 39.268,35.433 98.42,35.416 46.218,35.572 97.48,36.407 10.744,36.45 95.49,36.466 46.203,37.008 81.585,37.059 23.236,37.474 119.451,37.753 23.719,37.792 0.533,37.922 96.896,38.033 7.828,38.76 116.098,39.176 58.872,39.328 16.925,39.401 0.533,39.802 48.331,39.811 106.141,39.938 108.3,39.963 110.231,40.141 80.264,40.386 81.788,40.386 3.72,40.68 83.312,40.767 84.709,40.767 17.343,40.801 85.98,40.883 15.821,41.117 16.903,41.137 46.38,41.3 56.769,41.478 93.031,41.484 119.451,41.563 48.585,41.614 7.803,41.706 0.533,41.732 32.812,41.97 84.512,42.272 16.88,42.311 15.847,42.334 94.915,43.392 75.692,43.434 56.738,43.519 16.916,43.989 48.585,44.535 56.718,44.584 18.006,44.868 0.589,44.983 74.168,45.085 107.188,45.085 19.354,45.12 83.566,45.212 14.188,45.282 15.822,45.272 92.594,45.341 119.451,45.373 17.018,45.927 3.405,46.029 18.196,46.267 106.68,46.355 104.648,46.482 17.334,46.531 20.67,46.516 8.339,46.547 16.419,46.964 83.82,46.99 108.204,47.117 86.409,47.126 4.145,47.269 69.769,47.329 72.517,47.371 13.168,47.414 22.733,47.498 73.787,47.752 75.819,47.752 12.059,48.261 8.273,48.325 18.13,48.447 48.585,48.599 83.795,49.047 51.537,49.098 56.718,49.098 69.672,49.098 86.455,49.166 119.451,49.183 45.994,49.259 108.204,49.276 47.086,49.285 72.136,49.403 74.168,49.53 76.124,49.53 9.469,49.742 0.578,49.864 3.057,49.88 104.521,49.911 106.553,49.911 96.345,50.059 48.585,50.123 5.913,50.631 83.718,50.724 86.412,50.779 75.844,51.054 22.245,51.088 73.152,51.13 69.545,51.257 107.315,51.562 101.736,51.648 19.249,51.711 78.765,51.714 48.585,52.028 51.633,52.028 45.994,52.206 95.677,52.307 119.451,52.993 94.305,53.387 92.655,53.408 71.603,53.619 106.218,53.603 95.952,54.228 16.328,54.251 94.229,54.301 73.203,54.331 13.407,54.378 93.411,54.366 95.138,54.37 86.336,54.67 78.74,54.788 108.504,54.847 0.58,55.063 51.841,55.067 5.787,55.394 94.747,55.49 95.593,55.763 109.926,55.762 56.74,55.83 74.879,55.956 76.149,55.956 52.908,56.032 107.874,56.49 79.172,56.693 2.993,56.791 46.203,56.794 119.451,56.803 48.565,56.998 6.422,57.553 4.644,57.934 48.539,58.547 46.126,58.572 79.172,58.598 0.58,58.873 68.368,58.953 93.396,59.055 72.147,59.504 108.844,60.236 119.451,60.613 115.336,60.893 108.636,61.163 110.612,61.375 113.126,61.375 68.377,61.849 116.759,61.832 22.53,61.893 75.895,62.001 72.147,62.375 73.939,62.484 2.739,62.506 0.58,62.683 112.674,62.814 108.661,62.84 110.541,62.84 36.754,62.916 4.263,63.014 92.151,63.043 113.538,63.221 47.295,63.475 93.142,63.576 108.382,63.602 84.15,63.627 67.716,63.678 109.372,63.729 115.341,63.932 114.224,64.084 110.211,64.11 116.84,64.237 108.331,64.364 119.451,64.423 44.577,64.465 38.786,64.491 41.351,64.516 54.94,64.516 56.972,64.541 59.36,64.541 61.646,64.567 86.576,65.078 31.704,65.214 68.199,65.405 72.147,65.423 65.583,65.532 33.731,65.557 29.667,65.862 0.58,66.493 83.896,66.497 105.715,67.056 107.874,67.107 111.227,67.234 113.233,67.386 109.931,67.412 108.915,67.64 105.588,68.047 114.427,68.123 115.443,68.148 106.832,68.199 110.871,68.199 119.451,68.233 90.494,68.436 66.111,68.538 116.967,68.758 59.207,69.19 105.379,69.198 50.394,69.342 85.242,69.393 115.494,69.393 111.608,69.418 0.579,69.478 113.233,69.545 109.22,69.596 107.386,69.605 42.621,69.723 22.377,69.748 14.757,69.799 17.221,69.799 19.8,69.819 45.2,69.849 116.967,70.358 112.268,70.409 114.554,70.485 22.327,70.764 99.009,70.79 47.752,70.815 101.346,70.866 50.267,70.917 102.921,70.917 104.75,71.196 72.06,71.298 70.968,71.399 73.533,71.425 81.153,71.425 85.395,71.45 88.925,71.45 14.656,71.476 66.523,71.476 83.896,71.476 40.945,71.501 16.434,71.526 78.715,71.526 90.195,71.577 119.451,72.043 58.115,72.085 55.575,72.111 52.959,72.187 37.668,72.238 22.327,72.288 35.154,72.314 40.107,72.314 19.8,72.361 27.508,72.365 17.272,72.39 102.108,72.517 104.648,72.517 107.569,72.517 97.353,73.11 115.062,73.152 111.76,73.279 109.83,73.355 118.655,73.768 5.273,74.501 9.083,74.501 12.893,74.501 16.703,74.501 20.513,74.501 24.323,74.501 28.133,74.501 33.133,74.518 36.943,74.518 40.753,74.518 44.563,74.518 48.373,74.518 52.183,74.518 55.993,74.518 59.803,74.518 63.613,74.518 67.423,74.518 71.233,74.518 75.043,74.518 78.853,74.518 82.663,74.518 86.473,74.518 90.283,74.518 97.903,74.518 101.713,74.518 105.523,74.518 109.333,74.518 113.143,74.518 116.953,74.518
  other v2: 20.295,7.579 21.128,7.578 10.4,10 21.864,12.81 22.545,13.26 22.545,13.946 22.545,14.632 25.504,15.881 103.779,20.481 104.541,20.481 103.779,21.243 104.541,21.243 112.776,39.37 103.779,39.48 104.541,39.48 103.779,40.242 104.541,40.242 117.221,41.529 114.681,41.656 83.485,43.35 85.244,43.455 114.046,44.196 84.465,44.252 111.887,44.323 115.824,44.704 117.532,44.725 113.03,45.974 109.982,46.101 114.935,46.228 111.633,47.371 117.983,47.371 94.996,47.625 115.316,48.387 113.665,48.641 111.633,49.149 92.964,49.276 113.538,50.546 115.951,51.054 92.837,51.562 117.602,52.451 114.935,53.467 117.475,54.737 115.697,55.753
  other v3: 94.201,10.3 95.217,10.3 96.233,10.3 97.249,10.3 94.201,11.316 95.217,11.316 96.233,11.316 97.249,11.316 94.201,12.332 95.217,12.332 96.233,12.332 97.249,12.332 94.201,13.348 95.217,13.348 96.233,13.348 97.249,13.348 10.723,27.583 11.723,27.583 12.723,27.583 11.723,28.583 12.723,28.583 10.723,29.583 11.723,29.583 12.723,29.583 98.397,62.682 99.497,62.682 99.497,63.782 98.397,64.882 99.497,64.882 100.597,64.882
  other v4: 93.888,29.944 94.788,29.944 95.688,29.944 94.788,30.844 95.688,30.844 94.788,31.744
GPIO0_A5--GPIO1_B0--TYPEC0_INT: D8.1 P2.75 R113.1 | length 72.6
  01 TOP w0.156: D8.1@11.9,39.252 12.434,38.718 13.203,38.718 13.641,38.28 ; R113.1@13.641,37.55 13.641,38.28 ; v1(14.562,38.28) 13.641,38.28 ; v1(46.143,46) P2.75@77.95,46
  04 BOT w0.156: v1(14.562,38.28) 14.645,38.363 17.671,38.363 20.996,41.688 30.517,41.688 32.139,40.065 41.767,40.065 46.143,44.441 v1(46.143,46)
GPIO0_B6--GPIO3_C7--TF_PWR: P4.33 R37.1 | length 18.6
  01 TOP w0.156: v1(62.441,22.453) 73.621,22.453 75.253,20.821 77.473,20.821 77.861,20.434 77.923,20.434 77.956,20.4 P4.33@78.45,20.4
  04 BOT w0.156: R37.1@62.441,20.708 v1(62.441,22.453)
GPIO0_C5--GPIO3_C0--MIPI_DSI_INT: P4.1 P15.30 | length 81.4
  01 TOP w0.156: v1(31.811,2.458) 32.263,2.006 38.575,2.006 40.289,3.721 v1(40.289,4.771) ; v1(46.183,23.489) 71.164,23.489 74.476,26.8 P4.1@78.45,26.8
  04 BOT w0.156: P15.30@18.1,5.7 18.1,4.496 20.284,2.312 31.664,2.312 v1(31.811,2.458) ; 39.832,5.228 v1(40.289,4.771) ; 39.836,5.259 39.836,5.919 39.944,6.027 39.944,15.785 46.183,22.024 v1(46.183,23.489)
GPIO0_C6--GPIO3_B2--MIPI_DSI_EN: P4.39 P15.9 | length 64.7
  01 TOP w0.156: v1(42.217,20.115) 76.476,20.115 77.391,19.2 P4.39@78.45,19.2
  04 BOT w0.156: P15.9@28.6,5.7 28.6,4.76 29.14,4.22 37.808,4.22 38.416,4.829 38.416,5.872 38.721,6.178 38.721,16.619 v1(42.217,20.115)
GPIO0_D0--GPIO3_B7--MIPI_DSI_RESET: P4.9 P15.29 | length 78.4
  01 TOP w0.156: v1(32.715,2.458) 38.387,2.458 39.832,3.903 39.832,5.218 v1(40.289,5.675) ; v1(46.668,22.98) 71.393,22.98 73.502,25.09 77.828,25.09 77.938,25.2 P4.9@78.45,25.2
  04 BOT w0.156: P15.29@18.6,5.7 18.6,4.703 20.491,2.812 31.348,2.812 31.44,2.904 32.269,2.904 v1(32.715,2.458) ; v1(40.289,5.675) 40.352,5.738 40.352,15.506 46.668,21.823 v1(46.668,22.98)
GPIO0_D1--GPIO0_D0--PWREN: P4.4 R103.1 | length 77.5
  01 TOP w0.156: v1(39.112,40.546) 40.554,39.104 51.59,39.104 v1(52.164,38.529) ; v1(59.307,28.762) 79.029,28.762 80.063,27.727 80.063,27.301 80.964,26.4 P4.4@81.55,26.4
  04 BOT w0.156: R103.1@13.873,38.963 14.711,38.963 14.945,38.729 17.502,38.729 20.941,42.169 30.716,42.169 32.338,40.546 v1(39.112,40.546) ; v1(52.164,38.529) 59.307,31.387 v1(59.307,28.762)
GPIO0_D3--GPIO1_B2--HP_DET_L: P2.29 R127.1 R130.1 | length 48.4
  01 TOP w0.156: P2.29@77.95,55.2 78.488,55.2 79.868,56.58 79.868,62.207 80.355,62.694 81.401,62.694 83.456,60.638 89.998,60.638 92.951,57.685 v1(103.32,57.685)
  04 BOT w0.156: v1(103.32,57.685) 105.881,57.685 106.561,57.005 112.909,57.005 114.625,58.721 114.625,59.18 114.882,59.437 R127.1@115.288,59.437 R130.1@116.288,59.437
GPIO2_A6--GPIO4_A0--PUPDCTL1: P1.82 R100.1 | length 48.7
  01 TOP w0.156: R100.1@14.079,40.835 14.679,40.835 15.543,39.971 15.543,39.434 16.868,38.109 v1(16.868,37.868) ; P1.82@38.05,44.8 38.706,44.8 38.919,44.588 v1(47.104,44.588)
  04 BOT w0.156: v1(16.868,37.868) 16.868,37.755 17.184,37.439 17.817,37.439 21.105,40.727 30.118,40.727 31.741,39.104 42.165,39.104 47.104,44.043 v1(47.104,44.588)
GPIO2_A7--GPIO4_B0--PUPDCTL2: P1.48 R106.1 | length 54.6
  01 TOP w0.156: R106.1@14.079,41.71 14.501,41.71 15.919,40.292 15.919,39.584 17.455,38.048 v1(17.455,37.894) ; P1.48@38.05,51.6 38.533,51.6 38.596,51.664 v1(46.623,51.664)
  04 BOT w0.156: v1(17.455,37.894) 17.737,37.894 21.05,41.207 30.317,41.207 31.94,39.585 41.966,39.585 46.623,44.242 v1(46.623,51.664)
GPIO2_B0--GPIO4_B1--HDMI_ON: P1.46 Q10.1 Q11.1 Q12.1 Q13.1 | length 45
  01 TOP w0.156: v1(37.184,51.614) 37.57,52 P1.46@38.05,52
  04 BOT w0.156: Q12.1@20.051,58.101 21.271,58.101 ; Q10.1@20.051,61.126 21.246,61.126 21.739,60.633 21.739,60.207 22.32,59.626 ; Q13.1@23.101,59.626 22.32,59.626 ; v1(37.184,51.614) 39.091,49.708 40.999,49.708 42.416,48.291 42.416,46.227 41.394,45.205 33.211,45.205 24.308,54.109 24.308,55.967 23.649,56.626 Q11.1@23.101,56.626 22.32,56.626 21.739,57.207 21.739,57.633 21.271,58.101 ; 21.271,58.101 21.703,58.534 21.703,59.009 22.32,59.626
GPIO2_B1--GPIO4_A1--USB_RST: P1.80 R157.2 | length 55.6
  01 TOP w0.156: P1.80@38.05,45.2 38.918,45.2 39.074,45.045 v1(72.447,45.045)
  04 BOT w0.156: v1(72.447,45.045) 86.707,30.785 R157.2@87.681,30.785
GPIO2_B3--GPIO4_A2--EN: P1.76 P16.5 | length 89.8
  01 TOP w0.156: P1.76@38.05,46 38.78,46 39.28,45.5 v1(71.336,45.5) ; v1(85.72,8.594) 86.315,9.189 P16.5@87.797,9.189
  04 BOT w0.156: v1(71.336,45.5) 86.64,30.196 88.185,30.196 96.097,22.285 96.097,19.986 94.324,18.214 91.98,18.214 85.455,11.689 85.455,8.859 v1(85.72,8.594)
GPIO2_B5--GPIO4_B6--GPIO: P1.50 P16.4 | length 93.6
  01 TOP w0.156: P1.50@38.05,51.2 v1(68.372,51.2) ; P16.4@84.497,8.189 84.497,7.709 84.907,7.299 v1(85.161,7.299)
  04 BOT w0.156: v1(68.372,51.2) 68.372,47.152 86.255,29.268 87.8,29.268 95.169,21.9 95.169,20.371 93.94,19.142 91.595,19.142 84.527,12.073 84.527,7.933 v1(85.161,7.299)
GPIO2_C0--GPIO3_A2: P4.54 P26.15 | length 99.3
  01 TOP w0.156: P26.15@26.15,70.243 26.481,70.243 27.937,68.787 29.908,68.787 30.301,68.395 32.5,68.395 32.836,68.059 34.692,68.059 35.132,67.619 39.501,67.619 39.975,67.145 42.669,67.145 43.041,66.774 46.682,66.774 53.056,60.4 61.198,60.4 63.464,62.666 64.319,62.666 65.087,61.897 65.087,61.585 65.406,61.266 v1(66.025,61.266) ; v1(80.039,17.004) 80.596,16.447 81.045,16.447 81.092,16.4 P4.54@81.55,16.4
  04 BOT w0.156: v1(66.025,61.266) 66.025,45.551 81.751,29.825 81.751,17.956 81.263,17.468 80.502,17.468 v1(80.039,17.004)
GPIO2_C1--GPIO3_A3: P4.52 P26.37 | length 69.1
  01 TOP w0.156: v1(80.758,17.004) 80.962,16.8 P4.52@81.55,16.8
  04 BOT w0.156: P26.37@54.09,70.243 54.311,70.243 55.914,68.64 57.032,68.64 59.639,66.033 62.268,66.033 66.489,61.812 66.489,45.743 82.215,30.017 82.215,17.763 81.456,17.004 v1(80.758,17.004)
GPIO2_C2--GPIO3_A5: P4.62 P26.36 | length 78
  01 TOP w0.156: v1(79.311,15.604) 80.115,14.8 P4.62@81.55,14.8
  04 BOT w0.156: P26.36@51.55,72.783 52.832,71.501 54.483,71.501 55.362,70.622 55.362,69.86 56.11,69.112 57.227,69.112 59.835,66.505 62.464,66.505 66.961,62.007 66.961,45.938 82.687,30.213 82.687,17.568 81.651,16.532 80.238,16.532 v1(79.311,15.604)
GPIO2_C3--GPIO3_A0: P4.40 P26.35 | length 67
  01 TOP w0.156: v1(80.294,20.281) 80.294,19.617 80.663,19.247 81.045,19.247 81.092,19.2 P4.40@81.55,19.2
  04 BOT w0.156: P26.35@51.55,70.243 51.879,70.243 53.345,68.778 54.465,68.778 55.53,67.712 56.647,67.712 59.255,65.105 61.884,65.105 64.569,62.42 64.569,44.947 80.294,29.222 v1(80.294,20.281)
GPIO2_C4--GPIO3_A1: P4.38 P26.32 | length 73.4
  01 TOP w0.156: v1(80.758,19.804) 80.962,19.6 P4.38@81.55,19.6
  04 BOT w0.156: P26.32@46.47,72.783 47.752,71.501 51.963,71.501 52.832,70.632 52.832,69.875 53.552,69.155 54.743,69.155 55.722,68.176 56.84,68.176 59.447,65.569 62.076,65.569 65.032,62.612 65.032,45.139 80.758,29.414 v1(80.758,19.804)
GPIO2_C5--GPIO3_A4: P4.48 P26.33 | length 71.6
  01 TOP w0.156: P26.33@49.01,70.243 49.01,68.9 53.861,64.049 61.814,64.049 v1(62.742,63.121) ; v1(79.311,18.404) 80.115,17.6 P4.48@81.55,17.6
  04 BOT w0.156: v1(62.742,63.121) 62.742,44.19 78.467,28.465 78.467,19.248 v1(79.311,18.404)
GPIO2_C6--GPIO3_B3: P4.44 P26.7 | length 107
  01 TOP w0.156: P26.7@15.99,70.243 17.475,71.728 24.432,71.728 25.11,71.049 25.11,69.836 25.738,69.209 26.887,69.209 27.702,68.394 29.745,68.394 30.138,68.001 32.337,68.001 32.672,67.666 34.529,67.666 34.969,67.226 39.338,67.226 39.812,66.751 42.506,66.751 42.878,66.38 46.519,66.38 52.892,60.007 61.312,60.007 63.499,62.194 v1(64.105,62.194) ; v1@80.754,18.4 P4.44@81.55,18.4
  04 BOT w0.156: v1(64.105,62.194) 63.669,61.758 63.669,44.575 79.395,28.849 79.395,19.759 v1(80.75,18.404)
GPIO2_C7--GPIO3_B4: P4.42 P26.13 | length 96.2
  01 TOP w0.156: P26.13@23.61,70.243 23.61,70.179 25.368,68.421 26.561,68.421 27.376,67.606 29.419,67.606 29.811,67.214 32.011,67.214 32.346,66.878 34.203,66.878 34.643,66.438 39.011,66.438 39.486,65.964 42.18,65.964 42.551,65.592 46.193,65.592 52.566,59.219 61.74,59.219 63.28,60.759 63.598,60.759 v1(64.105,61.266) ; v1(79.83,20.758) 79.83,19.551 80.509,18.872 81,18.872 81.072,18.8 P4.42@81.55,18.8
  04 BOT w0.156: v1(64.105,61.266) 64.105,44.755 79.83,29.029 v1(79.83,20.758)
GPIO2_D0--GPIO3_B5: P4.46 P26.11 | length 100.4
  01 TOP w0.156: P26.11@21.07,70.243 22.174,71.347 24.246,71.347 24.663,70.93 24.663,69.722 25.571,68.815 26.724,68.815 27.539,68 29.582,68 29.974,67.608 32.174,67.608 32.509,67.272 34.366,67.272 34.806,66.832 39.174,66.832 39.649,66.358 42.343,66.358 42.715,65.986 46.356,65.986 52.729,59.613 61.553,59.613 v1(63.205,61.266) ; v1(80.03,18.404) 80.498,17.937 80.896,17.937 80.959,18 P4.46@81.55,18
  04 BOT w0.156: v1(63.205,61.266) 63.205,44.383 78.931,28.657 78.931,19.504 v1(80.03,18.404)
GPIO2_D1--GPIO3_A7: P4.58 P26.40 | length 72.6
  01 TOP w0.156: v1@80.754,15.6 P4.58@81.55,15.6
  04 BOT w0.156: P26.40@56.63,72.783 58.091,71.322 58.091,69.561 60.219,67.433 62.848,67.433 67.889,62.392 67.889,46.323 83.615,30.597 83.615,17.184 82.036,15.604 v1(80.75,15.604)
GPIO2_D2--GPIO3_B0: P4.56 P26.12 | length 108
  01 TOP w0.156: P26.12@21.07,72.783 22.125,73.838 24.206,73.838 24.892,73.152 24.892,72.212 25.37,71.734 26.212,71.734 27.379,70.568 27.379,70.002 28.2,69.181 30.071,69.181 30.464,68.789 32.663,68.789 32.999,68.453 34.855,68.453 35.295,68.013 39.664,68.013 40.138,67.539 42.832,67.539 43.204,67.167 46.845,67.167 53.219,60.794 61.093,60.794 63.342,63.044 64.435,63.044 v1(65.561,61.917) ; v1(79.319,17.004) 80.242,16.082 80.99,16.082 81.072,16 P4.56@81.55,16
  04 BOT w0.156: v1(65.561,61.917) 65.561,45.358 81.287,29.633 81.287,18.148 81.071,17.932 80.247,17.932 v1(79.319,17.004)
GPIO2_D3--GPIO3_B1: P4.60 P26.38 | length 75.6
  01 TOP w0.156: v1(80.03,15.604) 80.498,15.137 80.896,15.137 80.959,15.2 P4.60@81.55,15.2
  04 BOT w0.156: P26.38@54.09,72.783 55.372,71.501 57.114,71.501 57.683,70.931 57.683,69.312 60.027,66.969 62.656,66.969 67.425,62.2 67.425,46.13 83.151,30.405 83.151,17.376 81.843,16.068 80.494,16.068 v1(80.03,15.604)
GPIO2_D4--GPIO3_C2: P4.7 P26.22 | length 77.1
  01 TOP w0.156: P26.22@33.77,72.783 35.052,71.501 35.052,69.926 35.784,69.194 40.153,69.194 40.627,68.72 43.321,68.72 43.693,68.348 47.335,68.348 53.489,62.194 v1(59.03,62.194) ; v1(75.22,25.6) P4.7@78.45,25.6
  04 BOT w0.156: v1(59.03,62.194) 59.494,61.73 59.494,42.845 75.22,27.12 v1(75.22,25.6)
GPIO2_D5--GPIO3_C3: P4.5 P26.16 | length 83.6
  01 TOP w0.156: P26.16@26.15,72.783 27.393,71.54 29.12,71.54 30.004,70.656 30.004,69.805 30.627,69.182 32.826,69.182 33.162,68.847 35.018,68.847 35.458,68.407 39.827,68.407 40.301,67.933 42.995,67.933 43.367,67.561 47.008,67.561 53.304,61.266 v1(59.03,61.266) ; v1(74.756,26.102) 77.768,26.102 77.869,26 P4.5@78.45,26
  04 BOT w0.156: v1(59.03,61.266) 59.03,42.653 74.756,26.928 v1(74.756,26.102)
GPIO2_D6--GPIO3_A6: P4.35 P26.31 | length 68.9
  01 TOP w0.156: P26.31@46.47,70.243 47.11,70.243 53.768,63.585 61.35,63.585 v1(61.814,63.121) ; v1(77.743,20) P4.35@78.45,20
  04 BOT w0.156: v1(61.814,63.121) 62.278,62.658 62.278,43.998 78.003,28.273 78.003,20.26 v1(77.743,20)
GPIO2_D7--GPIO3_B6: P4.37 P26.29 | length 71.5
  01 TOP w0.156: P26.29@43.93,70.243 45.037,69.136 47.661,69.136 53.675,63.121 60.886,63.121 v1(61.814,62.194) ; v1(77.287,20.38) 77.287,19.808 77.545,19.55 77.937,19.55 77.987,19.6 P4.37@78.45,19.6
  04 BOT w0.156: v1(61.814,62.194) 61.814,43.806 77.539,28.081 77.539,20.632 v1(77.287,20.38)
GPIO3_A2--GPIO4_B3: P1.66 P28.11 | length 62.4
  01 TOP w0.156: P1.66@38.05,48 v1(71.165,48)
  04 BOT w0.156: v1(71.165,48) 71.165,65.975 73.797,68.607 74.507,68.607 75.44,69.54 75.44,70.773 75.973,71.306 77.982,71.306 P28.11@79.07,70.217
GPIO3_A3--GPIO4_B2: P1.54 P28.12 | length 60
  01 TOP w0.156: P1.54@38.05,50.4 38.571,50.4 38.912,50.741 v1(70.701,50.741)
  04 BOT w0.156: v1(70.701,50.741) 70.701,66.18 73.591,69.07 74.342,69.07 75.043,69.771 75.043,70.975 75.74,71.672 77.985,71.672 P28.12@79.07,72.757
GPIO3_D6--GPIO1_C6--CAM1_nRST: P2.51 P14.19 | length 83.5
  01 TOP w0.156: v1(52.013,50.278) 76.637,50.278 77.159,50.8 P2.51@77.95,50.8
  04 BOT w0.156: P14.19@51.491,5.78 51.491,4.653 51.965,4.179 56.955,4.179 58.065,5.289 58.065,7.087 59.859,8.881 59.859,31.625 52.013,39.47 v1(52.013,50.278)
GPIO4_A4--GPIO3_C5: P4.29 P28.16 | length 85.3
  01 TOP w0.156: v1(57.638,55.794) v1(73.02,55.794) ; v1(73.364,23.529) 73.956,23.529 76.035,21.45 77.748,21.45 77.998,21.2 P4.29@78.45,21.2
  04 BOT w0.156: v1(57.638,55.794) 57.638,42.077 73.364,26.351 v1(73.364,23.529) ; v1(73.02,55.794) 73.02,65.858 74.403,67.241 75.161,67.241 76.154,68.233 81.365,68.233 82.931,69.799 82.931,71.538 P28.16@84.15,72.757
GPIO4_A6--GPIO3_C4: P4.31 P28.15 | length 84.5
  01 TOP w0.156: v1(57.175,56.24) v1(73.484,56.24) ; v1(72.9,23.038) 73.736,23.038 75.639,21.135 77.619,21.135 77.954,20.8 P4.31@78.45,20.8
  04 BOT w0.156: v1(57.175,56.24) 57.175,41.885 72.9,26.159 v1(72.9,23.038) ; v1(73.484,56.24) 73.484,65.666 74.595,66.777 75.361,66.777 76.348,67.764 81.697,67.764 P28.15@84.15,70.217
GPIO4_B1--GPIO1_D3--CAM1_PWRDN: P2.61 P14.20 | length 79.3
  01 TOP w0.156: v1(52.164,37.739) 69.514,37.739 v1(74.962,43.187) v1@74.967,43.192 ; v1(73.025,48.8) P2.61@77.95,48.8
  04 BOT w0.156: P14.20@51.991,5.78 51.991,4.86 52.172,4.679 56.747,4.679 57.633,5.565 57.633,7.362 59.359,9.088 59.359,27.636 58.755,28.24 58.755,31.149 v1(52.164,37.739) ; v1(73.025,48.8) 73.025,45.123 v1(74.962,43.187)
GPIO4_C0--GPIO4_C1--HDMI_CEC: P1.52 Q14.2 R94.2 | length 41.1
  01 TOP w0.156: Q14.2@20.401,63.276 21.359,63.276 R94.2@21.501,63.134 v1(22.228,63.134) ; v1(37.338,50.8) P1.52@38.05,50.8
  04 BOT w0.156: v1(22.228,63.134) 24.844,60.518 24.844,54.331 33.538,45.637 41.215,45.637 42.032,46.454 42.032,48.101 40.839,49.294 38.844,49.294 v1(37.338,50.8)